# Altium PCB ConvertidorBuck.PcbDoc
Units mm, origin at the board's own origin, x right, y up, seen from the top; angles counter-clockwise.
Board outline 100 x 100 mm, 2 copper layers (Top Layer, Bottom Layer); 22 components, 7 nets, 47 pads, 3 vias.
Unrouted connection lines stored in the file: 1.
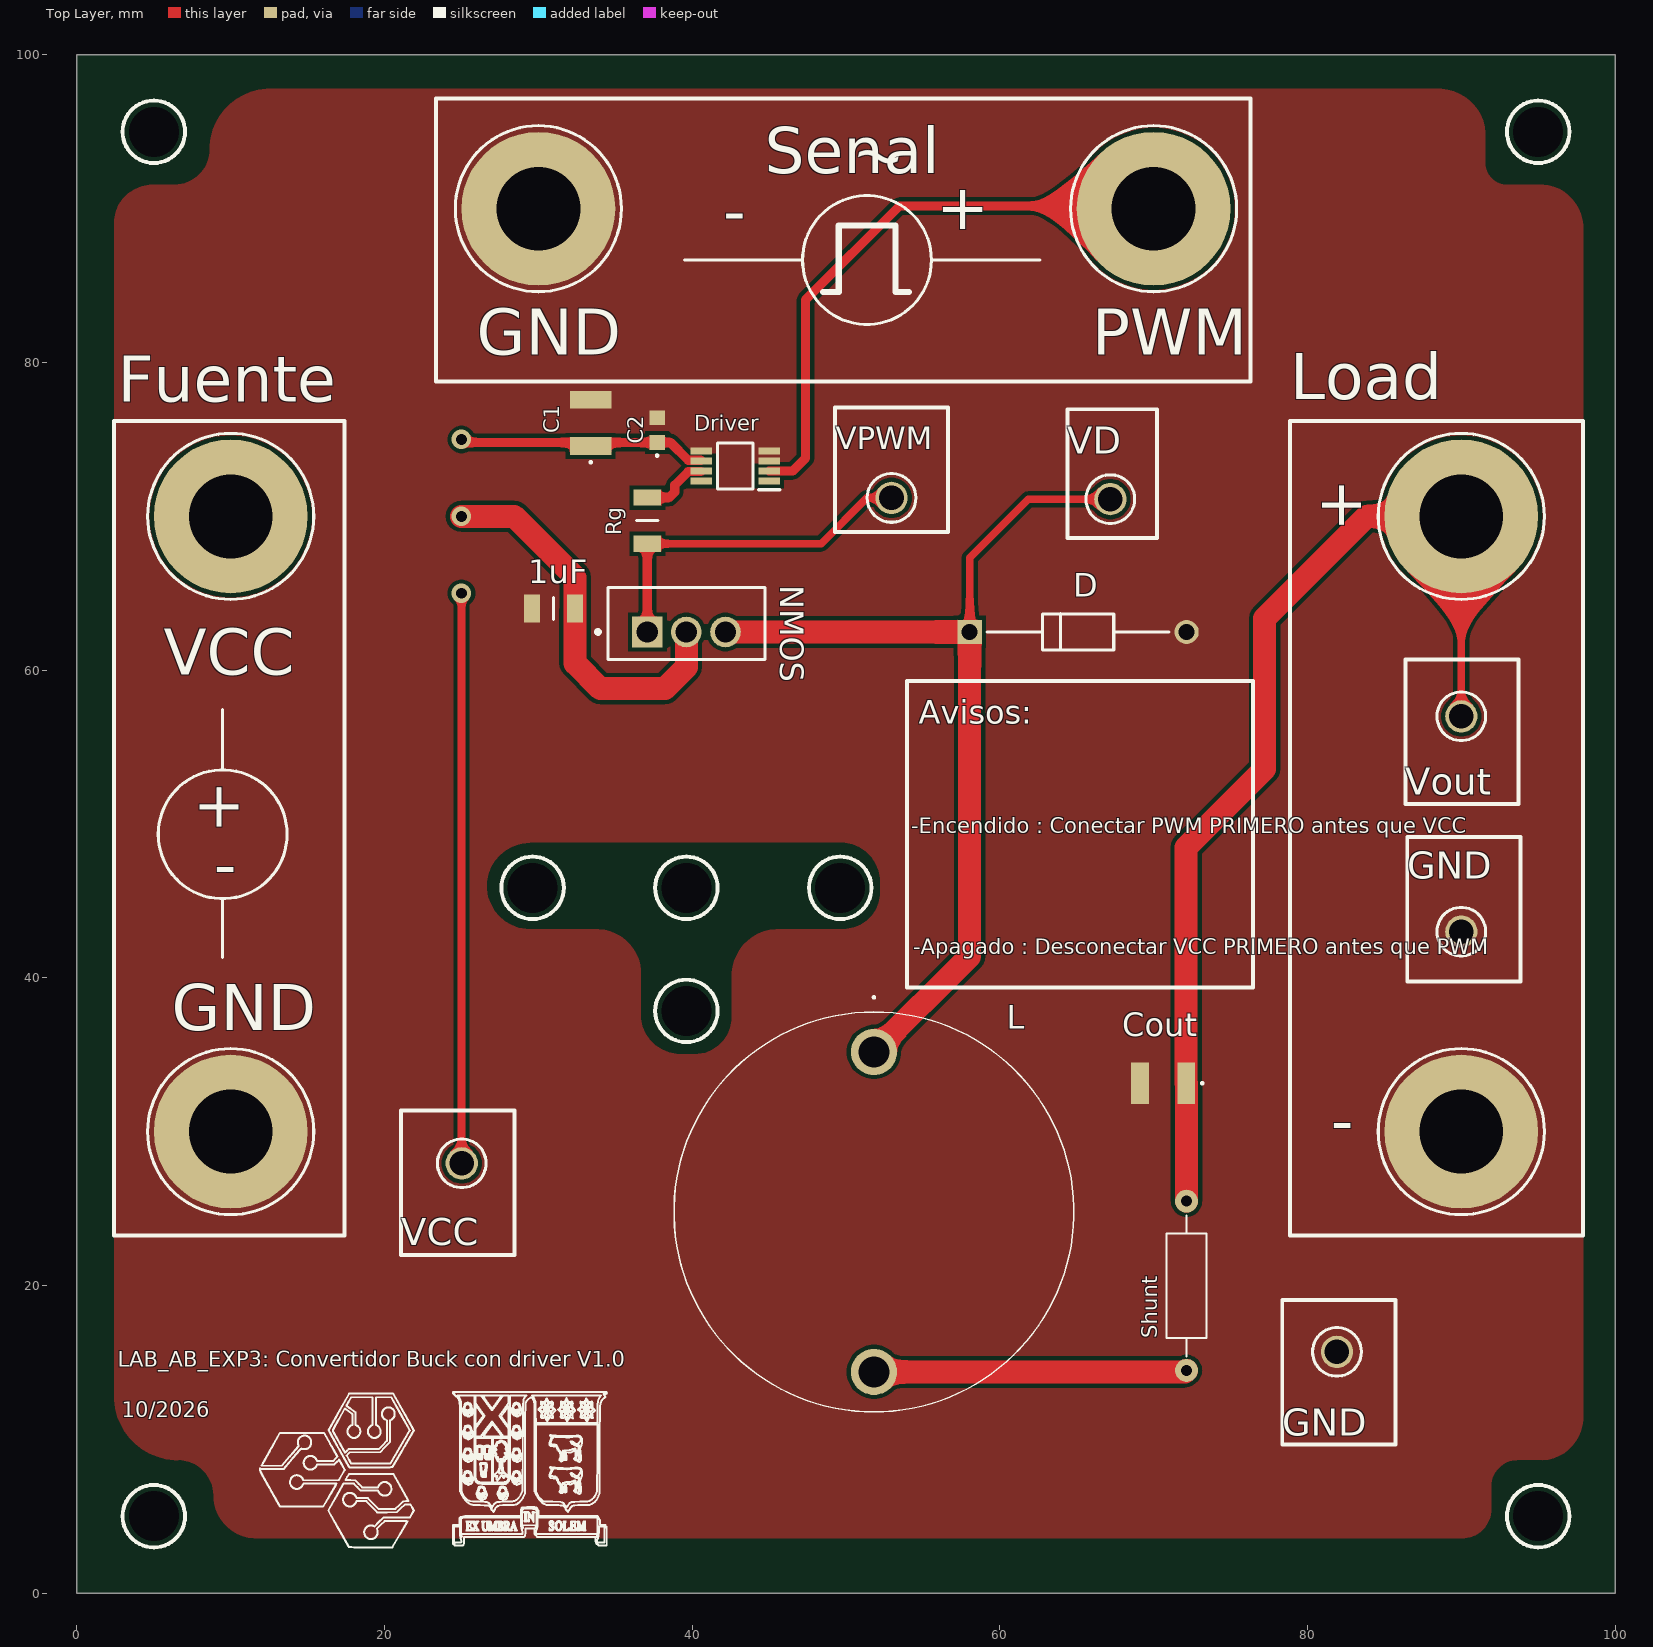
[diagram p0: Top Layer view]
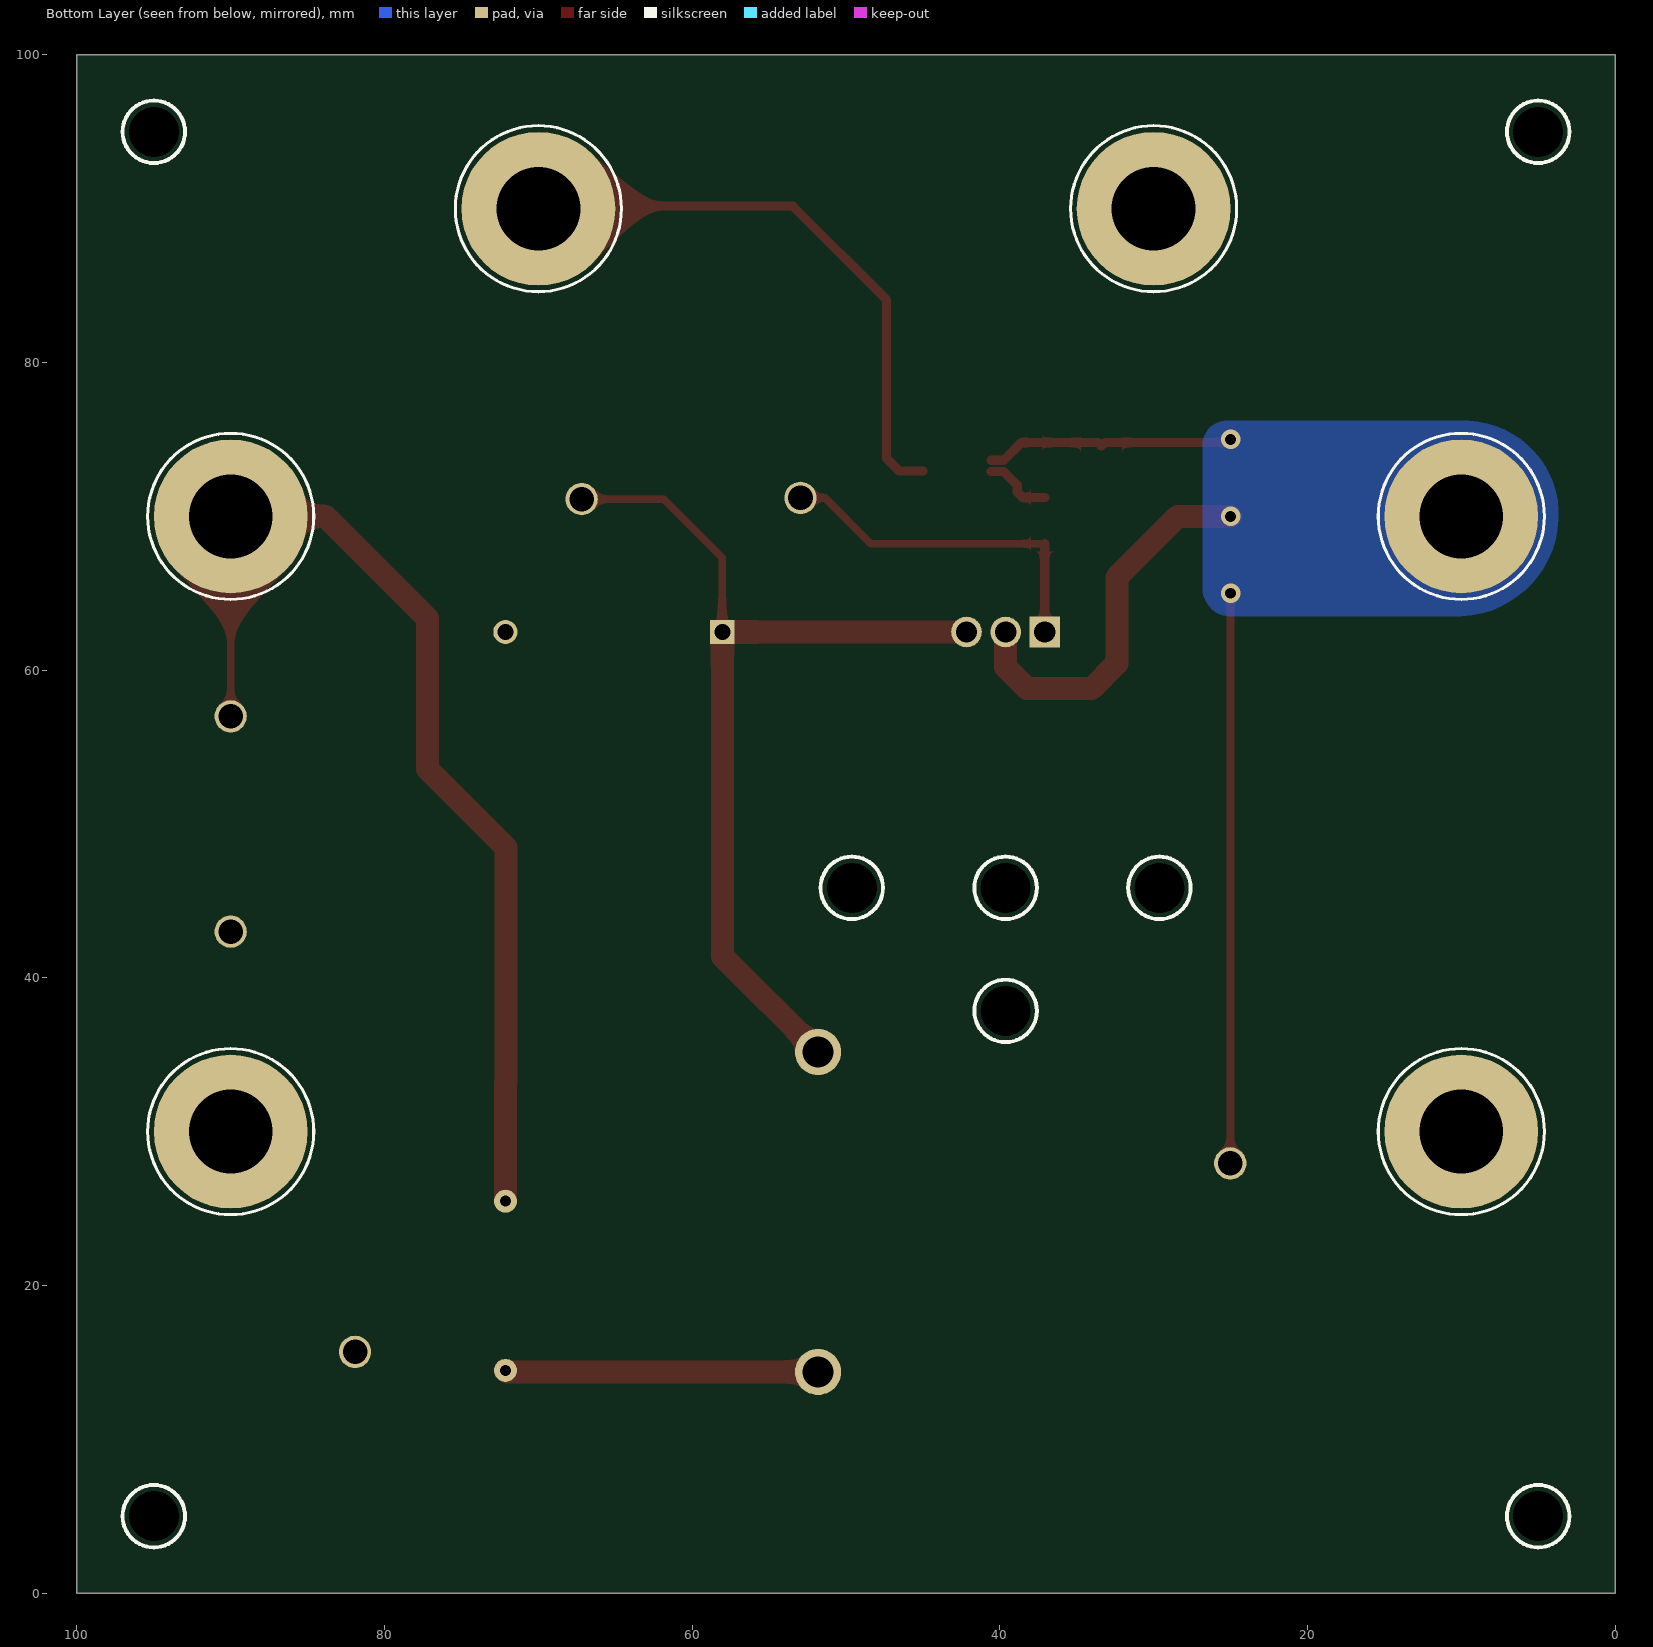
[diagram p1: Bottom Layer view, seen from below]

## Layer stack, top to bottom
Top Solder: solder mask 0.0102, Solder Resist, Dk 3.5
Top Layer: signal copper 0.0356
Dielectric 1: dielectric 0.32, FR-4, Dk 4.8
Bottom Layer: signal copper 0.0356
Bottom Solder: solder mask 0.0102, Solder Resist, Dk 3.5

## Board outline
0,0 0,100 100,100 100,0

## Design rules (kind name [scope] priority, off if disabled: settings)
Clearance [All] p1: gap=0.254 ignorepadtopadclearanceinfootprint=FALSE
HoleSize [All] p1: absolutevalues=TRUE maxlimit=7 minlimit=0.025 maxpercent=80.000 minpercent=20.000
PolygonConnect [All] p1: connectstyle=Direct reliefconductorwidth=0.254 reliefentries=4 polygonreliefangle="90 Angle" airgapwidth=0.254
RoutingVias [All] p1: holewidth=0.711 width=1.27 viastyle="Through Hole" minholewidth=0.711 minwidth=1.27 maxholewidth=0.711 maxwidth=1.27
SolderMaskExpansion [All] p1: expansion=0 istentingtop=FALSE
SupplyNets "Schematic Supply Nets_2" [InNet('Gate')] p1: voltage=0.000
SupplyNets "Schematic Supply Nets_1" [InNet('GND')] p2: voltage=0.000
SupplyNets "Schematic Supply Nets" [InNet('VCC')] p3: voltage=0.000
Width [All] p1: maxlimit=2 minlimit=0.254 preferedwidth=0.254
29 further rules are at their usual default settings.

## Components (designator, comment, footprint, x,y, rotation, side; value= is the part's Value field where it differs from the comment)
1uF "C1206C105K3RAC7800" CAPC3216X140N 30.988,64.008 r180 top (schematic designator C8)
+ "575-4" KSTN-575-4 90,70 r270 top (schematic designator TP37)
- "575-4" KSTN-575-4 90,30 r270 top (schematic designator TP38)
C1 "10uF" C1210 33.401,76.073 r90 top (schematic designator C11)
C2 "100nF" C0603 37.719,75.603 r90 top (schematic designator C10)
Cout "C1210C106M3PACTU" C1210 70.612,33.147 r180 top (schematic designator C1)
D "1N5819" DIOAD1408W86L464D236 58.039,62.484 r0 top (schematic designator D1)
Driver "TC4427EUA713" SOP65P490X110-8N 42.799,73.279 r180 top (schematic designator B1)
GND "5011" KSTN-5011_V 81.915,15.685 r0 top (schematic designator TP48)
GND "5011" KSTN-5011_V 90,43 r0 top (schematic designator TP47)
GND "575-4" KSTN-575-4 30,90 r0 top (schematic designator TP42)
GND "575-4" KSTN-575-4 10,30 r0 top locked (schematic designator TP40)
L "Inductor" AIRD-02 51.816,35.179 r270 top value=1u (schematic designator L1)
NMOS "IRLZ44N" IFX-PG-TO220-3-904-1 39.624,62.484 r0 top (schematic designator Q6)
PWM "575-4" KSTN-575-4 70,90 r0 top (schematic designator TP41)
Rg "10ohm" RESC3216X60N 37.084,69.723 r270 top (schematic designator X3)
Shunt "Zocalo_Resistencia_1/4W" Resistencia 72.136,14.478 r90 top (schematic designator R1)
VCC "5010" KSTN-5010_V 25.019,27.94 r0 top (schematic designator TP43)
VCC "575-4" KSTN-575-4 10,70 r0 top locked (schematic designator TP39)
VD "5014" KSTN-5014_V 67.183,71.12 r0 top (schematic designator TP45)
Vout "5013" KSTN-5013_V 90,57 r0 top (schematic designator TP46)
VPWM "5010" KSTN-5010_V 52.959,71.2 r0 top (schematic designator TP44)

## Footprints (in the part's own frame and the unit in brackets; to place one, negate y for a bottom-side part, rotate by r counter-clockwise, add the part's x,y. Pads: shape width x height; smd on the part's side, far side on the other; paste and mask are expansions set on the pad)
AIRD-02 [mm]
  round 3 hole 2: 1(0,0) 2(20.8,0)
  silkscreen extent -3.6,-13 23.4,13, body extent -0.9,-10.49 21.7,10.49, height 21.1
C0603 [mm]
  rect 0.95x1 smd: 1(-0.8,0) 2(0.8,0)
  silkscreen extent -1.7,-0.05 -1.6,0.05, body extent -0.87,-0.48 0.88,0.47, height 0.87
C1210 [mm]
  rect 1.15x2.7 smd: 1(-1.5,0) 2(1.5,0)
  silkscreen extent -2.6,-0.05 -2.5,0.05, body extent -1.8,-1.4 1.8,1.4, height 2.1
CAPC3216X140N [mm]
  rect 1.02x1.82 smd: 1(-1.4,0) 2(1.4,0)
  silkscreen extent 0,-0.7 0,0.7, body extent -1.83,-0.89 1.57,0.91, height 1.4
DIOAD1408W86L464D236 [mm]
  rect 1.575x1.575 / inner round 1.575 / far side rect 1.575x1.575 hole 1.05: 1(0,0)
  round 1.575 hole 1.05: 2(14.1,0)
  silkscreen extent 1.14,-1.18 12.96,1.19, body extent -0.43,-1.35 14.51,1.35, height 2.72
IFX-PG-TO220-3-904-1 [mm] "TO,flange mount,2.54 mm pitch, 3 pin, 10.16 mm L X 4.57 mm W X 20.56 mm H body"
  rect 1.99x1.99 hole 1.39 paste-2539.97 mask+0: 1(-2.54,0)
  round 1.99 hole 1.39 paste-2539.97 mask+0: 2(0,0) 3(2.54,0)
  silkscreen extent -5.87,-1.8 5.1,2.9, body extent -5.94,-19.59 5.94,0.25, height 4.41
KSTN-575-4 [mm] "Banana Jack, Non-Insulated, Dia 7.92mm"
  round 10 hole 5.45: 1(0,0)
  silkscreen extent -5.4,-5.4 5.4,5.4, body extent -3.98,-3.96 3.92,3.94, height 2.36
KSTN-5010_V [mm] "Test Point, Dia 3.17mm"
  round 2.1 hole 1.6: 1(0,0)
  silkscreen extent -1.59,-1.58 1.59,1.58, body extent -1.59,-1.59 1.59,1.59, height 8.13
KSTN-5011_V [mm] "Test Point, Dia 3.17mm"
  round 2.1 hole 1.6: 1(0,0)
  silkscreen extent -1.59,-1.58 1.59,1.58, body extent -1.59,-1.59 1.59,1.59, height 8.13
KSTN-5013_V [mm] "Test Point, Dia 3.17mm"
  round 2.1 hole 1.6: 1(0,0)
  silkscreen extent -1.59,-1.58 1.59,1.58, body extent -1.59,-1.59 1.59,1.59, height 8.13
KSTN-5014_V [mm] "Test Point, Dia 3.17mm"
  round 2.1 hole 1.6: 1(0,0)
  silkscreen extent -1.59,-1.58 1.59,1.58, body extent -1.59,-1.59 1.59,1.59, height 8.13
RESC3216X60N [mm]
  rect 1.05x1.8 smd: 1(-1.5,0) 2(1.5,0)
  silkscreen extent 0,-0.7 0,0.7, body extent -1.7,-0.8 1.5,0.8, height 0.55
Resistencia [mm]
  round 1.5 hole 0.711: 1(0,0) 2(11,0)
  silkscreen extent 0.89,-1.3 10.08,1.3, body extent -1.27,-1.27 12.27,1.27, height 6.39
SOP65P490X110-8N [mm]
  rect 1.4x0.45 smd: 1(-2.2,0.975) 2(-2.2,0.325) 3(-2.2,-0.325) 4(-2.2,-0.975) 5(2.2,-0.975) 6(2.2,-0.325) 7(2.2,0.325) 8(2.2,0.975)
  silkscreen extent -2.9,-1.5 1.15,1.55

## Part data
1uF: "Multilayer Ceramic Capacitors MLCC - SMD/SMT 25V 1uF X7R 1206 10%", Manufacturer_Name="Yageo Group", Mouser Part Number=80-C1206C105K3R7800, Datasheet Link=https://connect.kemet.com:7667/gateway/IntelliData-ComponentDocumentation/1.0/download/specsheet/C1206C105K3RACTU, Geometry.Height=1.4mm, Manufacturer_Part_Number=C1206C105K3RAC7800, Mouser Price/Stock=https://www.mouser.co.uk/ProductDetail/KEMET/C1206C105K3RAC7800?qs=9Bh1%2FLvCqWR5qBTiXKKjKA%3D%3D
+ - GND GND PWM VCC: library part CMP-2000-05649-1, "Banana Jack, Non-Insulated, 1-Pin THD, RoHS, Bulk", Color=-, Manufacturer=Keystone-Electronics, Package Description="1-Pin Through Hole Device, Dia 7.92 mm", Package Version="Rev. B, 11/1994", Body Material=-, Category=Connectors,Interconnects, Contact Finish=Nickel, Contact Material=Brass, Datasheet URL=http://www.keyelco.com/product-pdf.cfm?p=2379, Datasheet Version="Rev. B, 11/1994", Family=BananaandTipConnectors-Jacks,Plugs, Features=-, Gender=Female, Insulation=Non-Insulated, Manufacturer URL=http://www.keyelco.com/, Mounting Technology=ThroughHole, Mounting Type=ThroughHole, Operating Temperature=-, Package Reference=575-4, Package URL=http://www.keyelco.com/product-pdf.cfm?p=2379, Packaging=Bulk, Plug/Mating Plug Diameter=StandardBanana, Series=-, Termination=Solder, Type=BananaJack, Wire Gauge=-
C1: library part C1210C106M3PACTU, "Capacitor", Manufacturer_Name="Yageo Group", Mouser Part Number=80-C1210C106M3P, Datasheet Link=https://www.yageogroup.com/content/datasheet/asset/file/KEM_C1006_X5R_SMD, Manufacturer_Part_Number=C1210C106M3PACTU, Mouser Price/Stock=https://www.mouser.com/Search/Refine.aspx?Keyword=80-C1210C106M3P
C2: library part C0603X104M3RACTU, "Capacitor", Manufacturer_Name="Yageo Group", Mouser Part Number=80-C0603X104M3R, Arrow Part Number=C0603X104M3RACTU, Arrow Price/Stock=https://www.arrow.com/en/products/c0603x104m3ractu/kemet-corporation, Datasheet Link=https://www.yageogroup.com/content/datasheet/asset/file/KEM_C1013_X7R_FT-CAP_SMD, Height=0.87mm, Manufacturer_Part_Number=C0603X104M3RACTU, Mouser Price/Stock=https://www.mouser.co.uk/ProductDetail/KEMET/C0603X104M3RACTU?qs=p6yRp5s%252B%2FXSQKNqxiIj6xg%3D%3D
Cout: "Capacitor", Manufacturer_Name="Yageo Group", Mouser Part Number=80-C1210C106M3P, Datasheet Link=https://www.yageogroup.com/content/datasheet/asset/file/KEM_C1006_X5R_SMD, Manufacturer_Part_Number=C1210C106M3PACTU, Mouser Price/Stock=https://www.mouser.com/Search/Refine.aspx?Keyword=80-C1210C106M3P
D: "Schottky Barrier Rectifier Diodes", Manufacturer_Name=Diotec, Mouser Part Number=637-1N5819, Datasheet Link=https://www.diodes.com/assets/Datasheets/ds23001.pdf, Manufacturer_Part_Number=1N5819, Mouser Price/Stock=https://www.mouser.co.uk/ProductDetail/Diotec-Semiconductor/1N5819?qs=OlC7AqGiEDlzWAEqP18zhw%3D%3D
Driver: "TC4427A Series 1.5 A 18 Vmax 7 Ohm Dual Non Inverting MOSFET Driver - MSOP-8", Manufacturer_Name=Microchip, Mouser Part Number=579-TC4427EUA713, Datasheet Link=https://ww1.microchip.com/downloads/en/DeviceDoc/20001422G.pdf, Geometry.Height=1.1mm, Manufacturer_Part_Number=TC4427EUA713, Mouser Price/Stock=https://www.mouser.co.uk/ProductDetail/Microchip-Technology/TC4427EUA713?qs=6pREnGtJ7gG%2Fg%252Bua4Jcb3A%3D%3D
GND GND: library part CMP-1672-00003-4, "Test Point, Black, Through Hole, RoHS, Bulk", Colour=Black, Manufacturer=Keystone, Package Quantity=100, ComponentLink1Description="Manufacturer URL", ComponentLink1URL=http://www.keyelco.com/, ComponentLink2Description=Datasheet, ComponentLink2URL=http://www.keyelco.com/product-pdf.cfm?p=1320, Contact Material=Bronze, Contact Plating=Silver, DatasheetVersion="Rev. F, 12/2013", Height="8.12 mm", Mount="Through Hole", Mounting Technology="Through Hole", PackageDescription="1-Pin Through Hole Device, Dia 3.17 mm", PackageReference=5011, Packaging=Bulk, Pins=1, REACH SVHC="No SVHC", RoHSCompliant=true
NMOS: "OptiMOS 3 Power-Transistor, VDS 100V", Manufacturer="Infineon Technologies", Manufacturer Order Number=IRLZ44N, PackageReference=PG-TO220-3-904
Rg: library part CRCW120610R0FKTC, "Standard Thick Film Chip Resistors value 10R0 ohm.", Manufacturer_Name=Vishay, Geometry.Height=0.6mm, Manufacturer_Part_Number=CRCW120610R0FKTC
Shunt: "1.07 kOhms Â±1% 0.25W, 1/4W Through Hole Resistor Axial - Metal Film", Package="RADIAL-2 YAGEO", Check_prices=https://www.snapeda.com/parts/MFR-25FBF52-1K/Yageo/view-part/?ref=eda, MF=Yageo, MP=MFR-25FBF52-1K, SnapEDA_Link=https://www.snapeda.com/parts/MFR-25FBF52-1K/Yageo/view-part/?ref=snap
VCC VPWM: library part CMP-1672-00002-4, "Test Point, Red, Through Hole, RoHS, Bulk", Colour=Red, Manufacturer=Keystone, Package Quantity=100, ComponentLink1Description="Manufacturer URL", ComponentLink1URL=http://www.keyelco.com/, ComponentLink2Description=Datasheet, ComponentLink2URL=http://www.keyelco.com/product-pdf.cfm?p=1319, Contact Material=Bronze, Contact Plating=Silver, DatasheetVersion="Rev. F, 12/2013", Height="8.12 mm", Mount="Through Hole", Mounting Technology="Through Hole", PackageDescription="1-Pin Through Hole Device, Dia 3.17 mm", PackageReference=5010, Packaging=Bulk, Pins=1, REACH SVHC="No SVHC", RoHSCompliant=true
VD: library part CMP-1672-00006-4, "Test Point, Yellow, Through Hole, RoHS, Bulk", Colour=Yellow, Manufacturer=Keystone, Package Quantity=100, ComponentLink1Description="Manufacturer URL", ComponentLink1URL=http://www.keyelco.com/, ComponentLink2Description=Datasheet, ComponentLink2URL=http://www.keyelco.com/product-pdf.cfm?p=1323, Contact Material=Bronze, Contact Plating=Silver, DatasheetVersion="Rev. F, 12/2013", Height="8.12 mm", Mount="Through Hole", Mounting Technology="Through Hole", PackageDescription="1-Pin Through Hole Device, Dia 3.17 mm", PackageReference=5014, Packaging=Bulk, REACH SVHC="No SVHC", RoHSCompliant=true
Vout: library part CMP-1672-00005-4, "Test Point, Orange, Through Hole, RoHS, Bulk", Colour=Orange, Manufacturer=Keystone, Package Quantity=100, ComponentLink1Description="Manufacturer URL", ComponentLink1URL=http://www.keyelco.com/, ComponentLink2Description=Datasheet, ComponentLink2URL=http://www.keyelco.com/product-pdf.cfm?p=1322, Contact Material=Bronze, Contact Plating=Silver, DatasheetVersion="Rev. F, 12/2013", Height="8.12 mm", Mount="Through Hole", Mounting Technology="Through Hole", PackageDescription="1-Pin Through Hole Device, Dia 3.17 mm", PackageReference=5013, Packaging=Bulk, REACH SVHC="No SVHC", RoHSCompliant=True
L: SimulationGenericComponent=True

## Free pads (board coordinates)
  round 0 hole 3.25: 9(5,5) 9(5,95) 9(29.624,45.847) 9(39.624,37.847) 9(39.624,45.847) 9(49.624,45.847) 9(95,5) 9(95,95)

## Via types
v1: diameter 1.27, hole 0.711, Top Layer to Bottom Layer, 3 vias

## Nets (pads, with @x,y where several pads share a name; then routed paths per layer and width w, separated by ;. In a path a pad name is that pad's centre, name@x,y a point inside that pad or via, vN(x,y) a via of type N, cw(c..) or ccw(c..) an arc to the next point about the centre after c; other vN are vias at no path point)
Diode: D.1 L.1 NMOS.3 VD.1 | length 61.3
  Top Layer w0.5: D.1 58.039,67.31 61.849,71.12 VD.1
  Top Layer w1.5: NMOS.3 D.1 58.039,41.402 L.1
Gate: Driver.2 NMOS.1 PWM.1 Rg.2 VPWM.1 | length 61.1
  Top Layer w0.5: Rg.2 48.387,68.223 51.364,71.2 VPWM.1
  Top Layer w0.6: NMOS.1 Rg.2 ; Driver.2 46.538,72.954 47.371,73.787 47.371,84.074 53.467,90.17 69.83,90.17 PWM.1
GND: 1uF.2 -.1 C1.2 C2.2 Cout.2 D.2 Driver.3 Driver.4 Driver.5 GND.1
L_Out: L.2 Shunt.1 | length 20.4
  Top Layer w1.5: L.2 72.037,14.379 Shunt.1
NetB1_7: Driver.7 Rg.1 | length 4.5
  Top Layer w0.254: Driver.7@40.555,72.91 Driver.7
  Top Layer w0.6: Rg.1 38.506,71.223 38.862,71.579 38.862,72.031 39.741,72.91 Driver.7@40.555,72.91
Out: +.1 Cout.1 Shunt.2 Vout.1 | length 68.8
  Top Layer w0.5: Vout.1 90,69.215 +.1
  Top Layer w1.5: Shunt.2 72.136,33.123 Cout.1 72.112,48.485 77.216,53.589 77.216,63.373 83.843,70 +.1 ; +.1@89.133,69.067 +.1@89.281,69.215
VCC: 1uF.1 C1.1 C2.1 Driver.6 NMOS.2 VCC.1 | length 79
  Top Layer w0.254: C1.1 C1.1@33.631,74.803 ; Driver.6@40.555,73.648 Driver.6
  Top Layer w0.5: VCC.1@25.009,27.749 25.009,27.94 v1@25.01,64.99
  Top Layer w0.6: v1(25,75) 25.181,75 25.378,74.803 33.171,74.803 C1.1 ; C1.1@33.631,74.803 C2.1 38.586,74.803 39.741,73.648 Driver.6@40.555,73.648
  Top Layer w1.5: v1(25,70) 28.425,70 32.388,66.037 1uF.1 ; 1uF.1@32.385,64.008 32.385,60.452 34.036,58.801 38.227,58.801 39.624,60.198 NMOS.2
  Bottom Layer w0.254: v1(25,65) v1@25.01,64.99 ; VCC.1@25.01,27.949 VCC.1@25.019,27.94
pads on no net: Driver.1 Driver.8

## Polygon pours and split planes (outlines as drawn)
VCC on Bottom Layer "VCC_L02_P000" (solid, pour order 0): 3.683,70.104 ccw(c10.287,70.104) 10.287,63.5 25.019,63.5 ccw(c25.019,65.278) 26.797,65.278 26.797,74.676 ccw(c25.273,74.676) 25.273,76.2 9.779,76.2 ccw(c9.779,70.104)
GND on Top Layer "GND_L01_P002" (solid, pour order 2): 6.604,8.636 cw(c6.604,6.35) 8.89,6.35 ccw(c11.684,6.35) 11.684,3.556 90.043,3.556 ccw(c90.043,5.461) 91.948,5.461 91.948,6.985 cw(c93.599,6.985) 93.599,8.636 95.123,8.636 ccw(c95.123,11.43) 97.917,11.43 97.917,88.773 ccw(c95.123,88.773) 95.123,91.567 92.964,91.567 cw(c92.964,92.964) 91.567,92.964 91.567,94.742 ccw(c88.519,94.742) 88.519,97.79 12.573,97.79 ccw(c12.573,93.853) 8.636,93.853 cw(c6.35,93.853) 6.35,91.567 4.953,91.567 ccw(c4.953,89.027) 2.413,89.027 2.413,23.368 2.413,12.827 ccw(c6.604,12.827)

## Other copper
Top Layer:
  pour cut-out: 29.464,43.18 33.782,43.18 cw(c33.782,40.259) 36.703,40.259 36.703,37.592 ccw(c39.243,37.592) 39.243,35.052 40.132,35.052 ccw(c40.132,37.465) 42.545,37.465 42.545,40.132 cw(c45.593,40.132) 45.593,43.18 49.784,43.18 ccw(c49.784,45.593) 52.197,45.593 52.197,46.228 ccw(c49.657,46.228) 49.657,48.768 29.591,48.768 ccw(c29.591,45.593) 28.561,48.596 ccw(c29.464,45.963)

## Silkscreen, mask and mechanical layers (free items; w line width, h text height)
Top Overlay:
  drawing of 24971 lines, arcs and shapes, not listed
  text "~" at 50.142,92.5 h3 r346.5
  text "Senal" at 44.704,92.313 h3
  text "+" at 59.317,91.186 h3 r180
  text "-" at 42.029,88.408 h3
  text "Load" at 78.867,77.597 h3
  text "Fuente" at 2.667,77.454 h3
  text "Avisos:" at 54.737,56.515 h1.52
  text "+" at 7.983,52.797 h3 r270
  text "-Encendido : Conectar PWM PRIMERO antes que VCC" at 54.229,49.403 h1
  text "-" at 10.379,48.125 h3 r180
  text "-Apagado : Desconectar VCC PRIMERO antes que PWM" at 54.356,41.529 h1
  text "LAB_AB_EXP3: Convertidor Buck con driver V1.0" at 2.667,14.732 h1
  text "10/2026" at 2.921,11.43 h1
Bottom Overlay:
  circle w0.254: c49.624,45.847 r2.031
  circle w0.254: c39.624,45.847 r2.031
  circle w0.254: c39.624,37.847 r2.031
  circle w0.254: c29.624,45.847 r2.031
  circle w0.254: c95,5 r2.031
  circle w0.254: c95,95 r2.031
  circle w0.254: c5,95 r2.031
  circle w0.254: c5,5 r2.031